# Altium PCB Switch_Matrix_32_2.PCBDOC (part 4 of 9)
Units mm, origin at the board's own origin, x right, y up, seen from the top; angles counter-clockwise.
Board outline 222.54 x 100 mm, 6 copper layers (L1, P2, L3, P4, L5, L6), stack 1.61 mm thick; 629 components, 583 nets, 2332 pads, 825 vias.
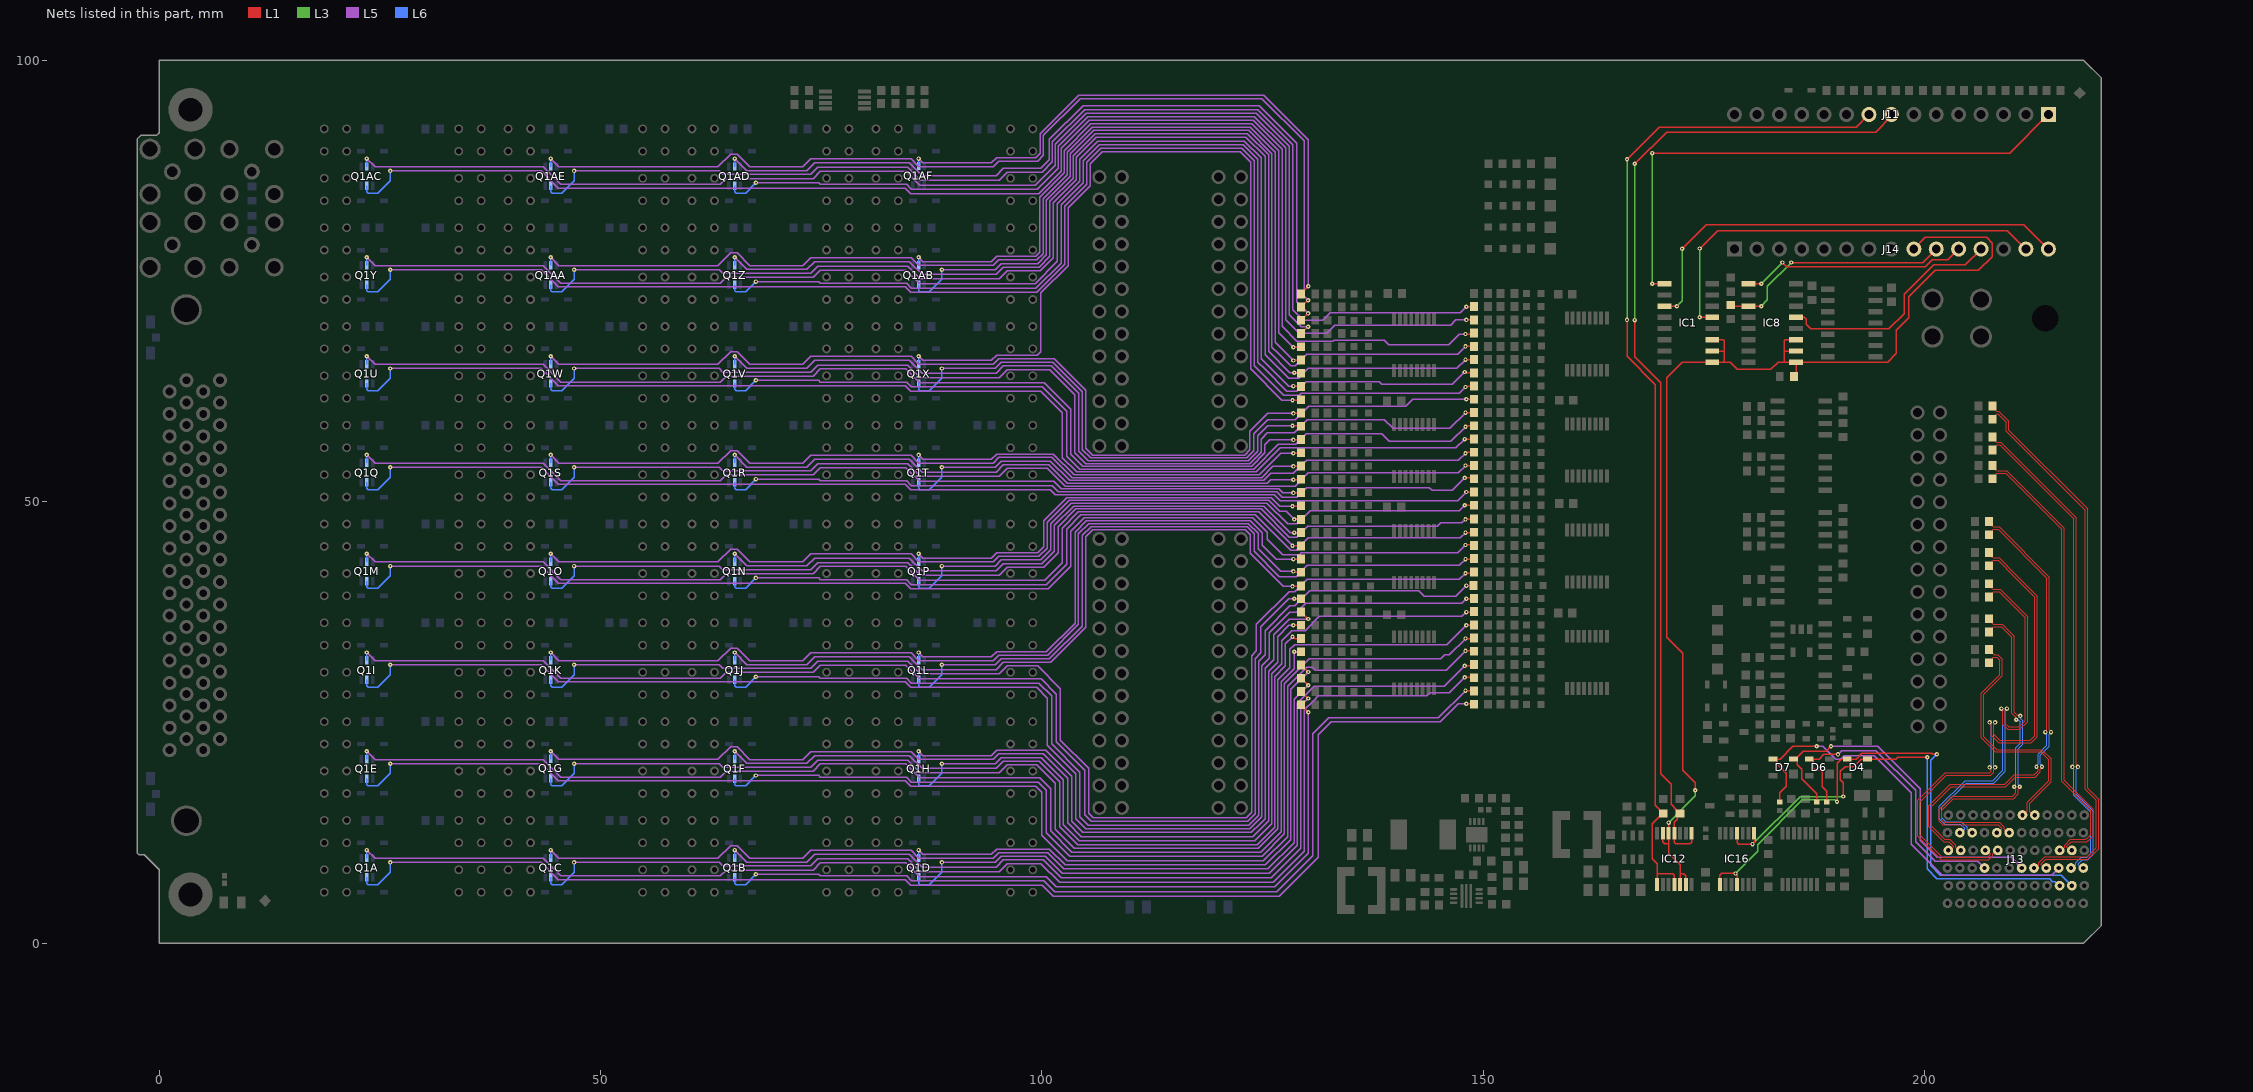
[diagram p7: the nets of this part, all layers, seen from the top]

## Part data (continued)
R23: library part R0603_62K_1%_0.1W_100PPM, "Resistor - 1%", Case=0603, Manufacturer=GENERIC, Manufacturer1 ComponentHeight=0.55mm, Manufacturer1 Example="NIC COMPONENT", Manufacturer1 Part Number=NRC06F6202TRF, Power=0.1W, Tolerance=±1%, Author="CERN DEM JLC", Component Type=Standard, CreateDate=03/12/2007, HelpURL=\\cern.ch\dfs\Applications\Altium\Datasheets\R0603_NIC_NRC.pdf, LatestRevisionDate=13/03/2008, Manufacturer Part Number=R0603_62K_1%_0.1W_100PPM, Mounted=Yes, Part Description="General Purpose Thick Film Chip Resistor", Part Number=R0603_62K_1%_0.1W_100PPM, Pin Count=2, PressFit=No, Sense=No, SMD=Yes, Socket=No, Status=Preferred, TC=±100ppm/°C
R56: library part R0603_24K_1%_0.1W_100PPM, "Resistor - 1%", Case=0603, Manufacturer=GENERIC, Manufacturer1 ComponentHeight=0.55mm, Manufacturer1 Example="NIC COMPONENT", Manufacturer1 Part Number=NRC06F2402TRF, Power=0.1W, Tolerance=±1%, Author="CERN DEM JLC", Component Type=Standard, CreateDate=03.12.2007, HelpURL=\\cern.ch\dfs\Applications\Altium\Datasheets\R0603_NIC_NRC.pdf, LatestRevisionDate=13.03.2008, Manufacturer Part Number=R0603_24K_1%_0.1W_100PPM, Mounted=Yes, Part Description="General Purpose Thick Film Chip Resistor", Part Number=R0603_24K_1%_0.1W_100PPM, Pin Count=2, PressFit=No, Sense=No, SMD=Yes, Socket=No, Status=Preferred, TC=±100ppm/°C
R85: library part R0402_220R_1%_0.0625W_100PPM, "Resistor - 1%", Case=0402, Manufacturer=GENERIC, Manufacturer1 ComponentHeight=0.4mm, Manufacturer1 Example="YAGEO PHYCOMP", Manufacturer1 Part Number=232270672201L, Power=0.0625W, Tolerance=±1%, Author="CERN DEM JLC", Component Type=Standard, CreateDate=03.12.2007, HelpURL=\\cern.ch\dfs\Applications\Altium\Datasheets\R0402_Phycomp_RC0402.pdf, LatestRevisionDate=17.10.2012, Manufacturer Part Number=R0402_220R_1%_0.0625W_100PPM, Mounted=Yes, Part Description="General Purpose Thick Film Chip Resistor", Part Number=R0402_220R_1%_0.0625W_100PPM, Pin Count=2, PressFit=No, Sense=No, SMD=Yes, Socket=No, Status="Not Recommended", TC=±100ppm/°C
R89 R90 R91 R92 R94 R97 R98A R98AA R98AB R98AC R98AD R98AE R98AF R98B R98C R98D R98E R98F R98G R98H R98I R98J R98K R98L R98M R98N R98O R98P R98Q R98R R98S R98T R98U R98V R98W R98X R98Y R98Z R99A R99AA R99AB R99AC R99AD R99AE R99AF R99B R99C R99D R99E R99F R99G R99H R99I R99J R99K R99L R99M R99N R99O R99P R99Q R99R R99S R99T R99U R99V R99W R99X R99Y R99Z R100 R112 R113 R145 R146 R147 R148 R149 R150 R152 R161 R162 R163 R164 R167 R168 R169 R170: library part R0603_0R_JUMPER, "Resistor", Case=0603, Manufacturer=GENERIC, Manufacturer1 ComponentHeight=0.55mm, Manufacturer1 Example="NIC COMPONENT", Manufacturer1 Part Number=NRC06Z0, Author="CERN DEM JLC", Component Type=Standard, CreateDate=03.12.2007, HelpURL=\\cern.ch\dfs\Applications\Altium\Datasheets\R0603_NIC_NRC.pdf, LatestRevisionDate=13.03.2008, Manufacturer Part Number=R0603_0R_JUMPER, Mounted=Yes, Part Description="1A (0.05R Max DC Resistance) Zero Ohm Jumper", Part Number=R0603_0R_JUMPER, Pin Count=2, PressFit=No, Sense=No, SMD=Yes, Socket=No, Status=Preferred
R110 R114: library part R0603_2K7_1%_0.1W_100PPM, "Resistor - 1%", Case=0603, Manufacturer=GENERIC, Manufacturer1 ComponentHeight=0.55mm, Manufacturer1 Example="YAGEO PHYCOMP", Manufacturer1 Part Number=RC0603FR-072K7L, Power=0.1W, Tolerance=±1%, Author="CERN DEM JLC", Component Type=Standard, CreateDate=02.05.2011, HelpURL=\\cern.ch\dfs\Applications\Altium\Datasheets\R0603_PHYCOMP_RC0603.pdf, LatestRevisionDate=02.05.2011, Manufacturer Part Number=R0603_2K7_1%_0.1W_100PPM, Mounted=Yes, Part Description="General Purpose Thick Film Chip Resistor", Part Number=R0603_2K7_1%_0.1W_100PPM, Pin Count=2, PressFit=No, Sense=No, SMD=Yes, Socket=No, Status=Preferred, TC=±100ppm/°C
R119 R120: library part "R0805_10M_1%_0.125W_100PPM_VISHAY_CRCW e3", "Resistor - 1%", Case=0805, Manufacturer="VISHAY DALE", Manufacturer Part Number=CRCW080510M0FKEA, Power=0.125W, Tolerance=±1%, Author="CERN DEM BC", Component Type=Standard, ComponentHeight=0.5mm, CreateDate=2019-11-12, HelpURL="\\cern.ch\dfs\Applications\Altium\Datasheets\R0805_VISHAY_CRCW e3.pdf", LatestRevisionDate=2019-11-12, Mounted=Yes, Part Description="150V, Standard Thick Film Chip Resistor", Part Number="R0805_10M_1%_0.125W_100PPM_VISHAY_CRCW e3", Pin Count=2, PressFit=No, Sense=No, SMD=Yes, Socket=No, Status=None, TC=±100ppm/°C
R126: library part R0805_1M1_1%_0.125W_100PPM, "Resistor - 1%", Case=0805, Manufacturer=GENERIC, Manufacturer1 ComponentHeight=0.6mm, Manufacturer1 Example="NIC COMPONENT", Manufacturer1 Part Number=NRC10F1104TRF, Author="CERN DEM JLC", Component Type=Standard, CreateDate=03/12/2007, HelpURL=\\cern.ch\dfs\Applications\Altium\Datasheets\R0805_NIC_NRC.pdf, LatestRevisionDate=13/03/2008, Manufacturer Part Number=R0805_1M1_1%_0.125W_100PPM, Mounted=Yes, Part Description="General Purpose Thick Film Chip Resistor", Part Number=R0805_1M1_1%_0.125W_100PPM, Pin Count=2, PressFit=No, Sense=No, SMD=Yes, Socket=No, Status=Preferred
R130 R131 R133 R136: library part R0402_22R_1%_0.0625W_100PPM, "Resistor - 1%", Case=0402, Manufacturer=GENERIC, Manufacturer1 ComponentHeight=0.4mm, Manufacturer1 Example="YAGEO PHYCOMP", Manufacturer1 Part Number=232270672209L, Power=0.0625W, Tolerance=±1%, Author="CERN DEM JLC", Component Type=Standard, CreateDate=03.12.2007, HelpURL=\\cern.ch\dfs\Applications\Altium\Datasheets\R0402_Phycomp_RC0402.pdf, LatestRevisionDate=17.10.2012, Manufacturer Part Number=R0402_22R_1%_0.0625W_100PPM, Mounted=Yes, Part Description="General Purpose Thick Film Chip Resistor", Part Number=R0402_22R_1%_0.0625W_100PPM, Pin Count=2, PressFit=No, Sense=No, SMD=Yes, Socket=No, Status="Not Recommended"
RL1A RL1AA RL1AB RL1AC RL1AD RL1AE RL1AF RL1B RL1C RL1D RL1E RL1F RL1G RL1H RL1I RL1J RL1K RL1L RL1M RL1N RL1O RL1P RL1Q RL1R RL1S RL1T RL1U RL1V RL1W RL1X RL1Y RL1Z RL2A RL2AA RL2AB RL2AC RL2AD RL2AE RL2AF RL2B RL2C RL2D RL2E RL2F RL2G RL2H RL2I RL2J RL2K RL2L RL2M RL2N RL2O RL2P RL2Q RL2R RL2S RL2T RL2U RL2V RL2W RL2X RL2Y RL2Z: library part REL_COTO_2342-05-000, "Reed Relay DPDT (2 Form C) 5VDC Coil Through Hole", Manufacturer="Coto Technology", Author=KB, Component Type=Standard, ComponentHeight=9.7mm, CreateDate=03.02.2026, HelpURL=https://cototechnology.com/library/datasheet/cotoclassic-2300-series-reed-relay-datasheet.pdf, LatestRevisionDate=03.02.2026, Manufacturer Part Number=2342-05-000, Mounted=Yes, PackageDescription="Coto Tecnology Case 2300, 8 Leads, Body Length 20.57mm, Width 5.33mm, x Height 9.7mm, 2300 Series", Part Description="Reed Relay DPDT (2 Form C) 5VDC Coil Through Hole", Part Number=2342-05-000, Pin Count=8, PressFit=No, Sense=No, SMD=No, Socket=No, Status=None
SCREW1 SCREW2: library part MECH_Tyco_SCSI_Screwlock, "SCSI Screw Lock", Manufacturer="TYCO ELECTRONICS", Manufacturer Part Number=786585-2, Part Number=TYCO_786585-2, Author=GK, ComponentHeight=9.02mm, Component Type=Mechanical, CreateDate=10.09.2013, LatestRevisionDate=10.09.2013, Mounted=Yes, PackageDescription="50SR SCREWLOCK KIT, FEMALE", Part Description="50SR SCREWLOCK KIT, FEMALE", Pin Count=0, PressFit=No, Sense=No, SMD=No, Socket=No, Status=None
T1 T2 T3 T4: "N-CHANNEL MOSFET WITH DIODE", Case=SOT23-3, Manufacturer="ON SEMICONDUCTOR", Manufacturer Part Number=BSS138L, Author="CERN DEM JLC", Bonding=No, Component Type=Standard, ComponentHeight=1.11mm, CreateDate=23.03.2009, Device=BSS138LT1G, HelpURL=\\cern.ch\dfs\Applications\Altium\Datasheets\BSS138LT1G.pdf, LatestRevisionDate=25.05.2022, Mounted=Yes, PackageDescription="SOT23, 0.95mm Pitch; 3 Pin, 1.40mm W X 3.00mm L X 1.10mm H body, IPC Medium Density", Part Description="50V, 200mA N-Channel Enhancement Mode Field-Effect Transistor", Part Number=BSS138LT1G, Pin Count=3, PressFit=No, Sense=No, SMD=Yes, Socket=No
TP1 TP2 TP3 TP4 TP5 TP7 TP11 TP16 TP17: library part SMD_PAD_1.27X1.27MM, Author="CERN DEM JLC", ComponentHeight=0mm, Component Type="Standard (No BOM)", CreateDate=12.01.2008, Family="Test Point", HelpURL=Undefined, LatestRevisionDate=12.01.2008, Mounted=No, PackageDescription="1.27mm x 1.27mm PCB Copper Area (SMD Test Point)", Part Description="1.27mm x 1.27mm PCB Copper Area (SMD Test Point)", Part Number=SMD_PAD_1.27X1.27MM, Pin Count=1, Sense=No, SMD=Yes, Socket=No, Status=None

## Via types
v1: diameter 0.5, hole 0.2, L1 to L6, tented both sides, 775 vias
v2: diameter 0.7, hole 0.4, L1 to L6, tented both sides, 41 vias
v3: diameter 0.5, hole 0.2, L1 to L6, 5 vias
v4: diameter 0.6, hole 0.3, L1 to L6, tented both sides, 4 vias

## Nets (pads, with @x,y where several pads share a name; then routed paths per layer and width w, separated by ;. In a path a pad name is that pad's centre, name@x,y a point inside that pad or via, vN(x,y) a via of type N, cw(c..) or ccw(c..) an arc to the next point about the centre after c; other vN are vias at no path point)
ARDU_CSnA: IC8.13 J14.12 | length 26.8
  L1 w0.152: IC8.13@185.45,70.885 186.384,70.885 186.6,70.669 186.6,70.089 186.689,70 186.7,70 187.1,69.6 195.973,69.6 197.684,71.311 197.684,73.484 201.024,76.824 204.604,76.824 J14.12@206.41,78.63
ARDU_CSnB: IC8.1 J14.11 | length 25.9
  L1 w0.152: IC8.1@180.05,74.695 IC8.1@180.057,74.688 ; IC8.1@180.057,74.695 v1(181.493,74.695) ; v1(183.899,77.101) 184.396,76.604 200.104,76.604 200.9,77.4 202.64,77.4 J14.11@203.87,78.63
  L3 w0.152: v1(181.493,74.695) v1(183.899,77.101)
ARDU_MISO: IC1.3 J14.15 | length 52
  L1 w0.152: IC1.3@170.595,72.2 IC1.3@170.55,72.155 v1(171.945,72.155) ; v1(172.535,78.648) 175.287,81.4 211.26,81.4 J14.15@214.03,78.63
  L3 w0.152: v1(171.945,72.155) 172.535,72.745 v1(172.535,78.648)
ARDU_MOSI: IC1.13 J14.14 | length 47.9
  L1 w0.152: v1(174.518,78.685) 176.556,80.723 209.397,80.723 J14.14@211.49,78.63 ; v1@174.54,70.892 IC1.13@175.942,70.892 ; IC1.13@175.935,70.9 IC1.13@175.942,70.892 ; IC1.13@175.95,70.885 IC1.13@175.942,70.892
  L3 w0.152: v1(174.518,70.892) v1(174.518,78.685)
ARDU_MUX: IC1.9 IC1.10 IC1.11 IC8.9 IC8.10 IC8.11 IC12.5 IC12.6 IC12.12 IC12.13 J14.9 R96.2 | length 133.6
  L1 w0.152: IC12.6@170.36,12.465 IC12.6@170.36,12.448 170.36,11.465 170.585,11.24 171.01,11.24 ; IC12.5@171.01,12.448 171.01,11.24 ; IC12.5@171.009,12.448 v1(171.009,13.648) ; IC12.12@172.31,6.648 172.31,7.873 ; IC12.13@172.96,6.648 172.96,7.648 172.735,7.873 172.31,7.873 ; v1(174.038,17.3) 174.038,18.162 172.6,19.6 172.6,32.828 170.773,34.655 170.773,64.023 172.55,65.8 175.95,65.8 177.201,65.8 ; IC1.10@175.95,67.075 177.29,67.075 ; IC1.11@175.95,68.345 177.201,68.345 177.29,68.256 177.29,67.075 ; R96.2@185.2,64.2 185.45,64.45 IC8.9@185.45,65.805 ; IC8.10@185.45,67.075 184.11,67.075 ; IC8.11@185.45,68.345 184.199,68.345 184.11,68.256 184.11,67.075 ; J14.9@198.79,78.63 200.104,79.944 207.056,79.944 207.692,79.308 207.692,77.776 206.117,76.2 201.2,76.2 198.233,73.233 198.233,70.833 196.8,69.4 196.8,66.793 195.812,65.805 IC8.9@185.45,65.805 ; 171.01,11.24 171.01,10.19 172.31,8.89 172.31,7.873 ; 177.201,65.8 178,65.8 178.8,65 182.6,65 183.405,65.805 184.194,65.805 ; 177.201,65.8 177.29,65.889 177.29,67.075 ; 184.11,67.075 184.11,65.889 184.194,65.805 ; 184.194,65.805 IC8.9@185.45,65.805
  L3 w0.152: v1(171.009,13.648) 174.038,16.677 v1(174.038,17.3)
ARDU_OE: IC8.3 J14.10 R95.2 | length 26.8
  L1 w0.152: R95.2@178.25,72.3 178.395,72.155 IC8.3@180.05,72.155 IC8.3@180.105,72.1 ; IC8.3@180.069,72.155 v1@181.471,72.155 ; v1(184.9,77.101) 199.801,77.101 J14.10@201.33,78.63
  L3 w0.152: v1(181.493,72.155) 182.2,72.862 182.2,74.4 v1@184.9,77.1 ; J14.10@201.315,78.615 J14.10@201.33,78.63
ARDU_SCK: IC1.1 J11.1 | length 62.6
  L1 w0.152: v1(169.15,74.695) IC1.1@170.545,74.695 ; 169.4,89.5 209.66,89.5 J11.1@214.03,93.87
  L1 w0.254: IC1.1@170.547,74.697 IC1.1@170.55,74.695
  L3 w0.152: v1(169.15,74.695) v1(169.15,89.5)
ARDU_SCL: IC12.8 IC12.11 J11.9 R102.2 | length 117.1
  L1 w0.152: v1(166.297,70.602) 166.297,66.455 169.507,63.244 169.507,18.107 169.5,18.1 169.5,15.6 169.976,15.124 169.976,15.074 R102.2@170.35,14.7 ; v1(166.297,88.8) 169.949,92.453 192.293,92.453 J11.9@193.71,93.87 ; IC12.8@169.71,6.665 169.71,7.858 ; R102.2@170.4,14.7 R102.2@170.35,14.7 ; IC12.11@171.66,6.665 171.66,7.664 171.465,7.858 169.71,7.858 ; 169.71,7.858 169.71,8.99 169.147,9.553 169.147,13.497 R102.2@170.35,14.7
  L3 w0.152: v1(166.297,70.602) v1(166.297,88.8)
ARDU_SDA: IC12.1 IC12.4 J11.8 R101.2 | length 114
  L1 w0.152: v1(167.179,70.575) 167.179,66.421 170.107,63.493 170.107,19.193 171.3,18 171.3,15.7 171.876,15.124 171.876,15.074 R101.2@172.157,14.793 ; v1(167.179,88.279) 170.773,91.873 194.473,91.873 196.25,93.65 J11.8@196.25,93.87 ; R101.2@172.3,14.7 172.25,14.7 R101.2@172.157,14.793 ; IC12.1@173.61,12.465 IC12.1@173.61,12.448 173.61,11.429 173.412,11.231 171.831,11.231 171.66,11.403 IC12.4@171.66,12.448 171.66,13.665 171.999,14.004 171.999,14.635 R101.2@172.157,14.793
  L3 w0.152: v1(167.179,70.575) v1(167.179,88.279)
BGA0: D7.3 J13.C3 R130.2 | length 48.7
  L1 w0.152: D7.3@182.85,20.85 D7.3@183.05,20.85 ; R130.2@183.6,15.97 183.6,17 184.349,17.749 184.349,19.247 183.274,20.321 183.274,20.626 D7.3@183.05,20.85 ; v1(187.802,22.294) 185.094,22.294 183.65,20.85 D7.3@183.05,20.85
  L5 w0.152: v1(187.802,22.294) 188.49,22.294 189.946,20.839 190.539,20.839 190.9,21.2 194.3,21.2 198.5,17 198.5,11.2 202,7.7 214.4,7.7 J13.C3@215.2,8.5
BGA1: D7.2 J13.F3 R131.2 | length 41.5
  L1 w0.152: D7.2@185.15,20.85 D7.2@185.35,20.85 ; R131.2@187.8,15.97 187.8,16.9 186.1,18.6 186.1,19.7 185.574,20.226 185.574,20.626 D7.2@185.35,20.85 ; v1(189.401,22.294) 188.846,21.739 186.239,21.739 D7.2@185.35,20.85
  L5 w0.152: v1(189.401,22.294) 194.706,22.294 199.5,17.5 199.5,11.65 201.45,9.701 209.799,9.701 J13.F3@211,8.5
BGA2: D6.3 J13.I3 R136.2 | length 35.3
  L1 w0.152: R136.2@188.9,15.97 188.9,17.2 188.4,17.7 188.4,19.4 188.2,19.6 187.6,19.6 187.374,19.826 187.374,20.626 187.174,20.626 D6.3@186.95,20.85 188.05,20.85 188.569,21.369 v1(190.2,21.369)
  L5 w0.152: v1(190.2,21.369) 190.631,21.8 194.5,21.8 199,17.3 199,11.458 201.205,9.253 206.047,9.253 J13.I3@206.8,8.5
BP_I2C.SCL: D4.3 IC16.8 IC16.11 J13.B2 | length 65.9
  L1 w0.152: IC16.8@176.832,6.625 IC16.8@176.809,6.648 ; IC16.8@176.909,6.748 IC16.8@176.809,6.648 ; IC16.11@178.759,6.665 178.759,7.709 v1(178.587,7.881) 177.007,7.881 176.809,7.683 IC16.8@176.809,6.648 ; v1(190.088,16) 190.088,20.388 190.55,20.85 D4.3@191.25,20.85 192.25,20.85 192.9,21.5 200.812,21.5 200.922,21.39 v1(201.402,21.39)
  L3 w0.152: v1(178.587,7.881) 181.085,10.379 181.085,11.161 186.132,16.208 189.825,16.208 190.033,16 v1(190.088,16)
  L6 w0.152: v1(201.402,21.39) 200.7,20.687 200.7,8.8 201.804,7.696 215.504,7.696 J13.B2@216.7,6.5
BP_I2C.SDA: D4.2 IC16.1 IC16.4 J13.C2 | length 58.6
  L1 w0.152: IC16.4@178.759,12.431 178.759,11.386 178.93,11.215 v1(180.511,11.215) 180.709,11.413 IC16.1@180.709,12.448 ; v1(190.8,16.6) 190.8,18.174 190.467,18.507 190.467,19.467 191,20 192,20 192.85,20.85 D4.2@193.55,20.85 196.75,20.85 196.943,21.043 v1(200.317,21.043)
  L3 w0.152: v1(180.511,11.215) 185.896,16.6 v1(190.8,16.6)
  L6 w0.152: v1(200.317,21.043) 200.3,21.026 200.3,8.4 201.396,7.304 214.161,7.304 214.493,6.973 214.827,6.973 J13.C2@215.3,6.5
BP_IO.LVDS_N0: J13.E3 R161.1 | length 62.9
  L1 w0.127: R161.1@207.7,59.35 208.087,59.736 208.087,59.886 208.161,59.96 208.309,59.96 209.263,59.007 209.263,58.007 218.236,49.034 218.236,17.405 219.467,16.174 219.467,10.784 218.443,9.76 213.617,9.76 212.96,9.103 212.96,8.882 212.579,8.5 J13.E3@212.4,8.5
BP_IO.LVDS_N1: J13.B3 R162.1 | length 54.9
  L1 w0.127: R162.1@207.7,55.85 208.087,56.237 208.087,56.386 208.161,56.46 208.54,56.46 216.928,48.072 216.928,20.217 216.755,20.043 v1(216.755,19.956)
  L6 w0.127: J13.B3@216.6,8.5 216.779,8.5 217.16,8.882 217.16,9.103 217.77,9.713 218.36,9.713 218.841,10.193 218.841,14.807 216.928,16.719 216.928,19.695 216.755,19.869 v1(216.755,19.956)
BP_IO.LVDS_N2: J13.C4 R163.1 | length 51.1
  L1 w0.127: R163.1@207.7,52.6 208.087,52.987 208.087,53.136 208.161,53.21 209.184,53.21 212.982,49.413 215.535,46.859 215.535,18.343 218.84,15.037 218.841,12.293 218.427,11.88 218.404,11.88 218.248,11.759 216.517,11.759 215.86,11.103 215.86,10.882 215.479,10.5 J13.C4@215.3,10.5
BP_IO.LVDS_N3: J13.L4 R164.1 | length 52.6
  L1 w0.127: J13.L4@202.7,10.5 202.879,10.5 203.26,10.882 203.26,10.987 202.767,11.48 202.178,11.48 200.5,13.158 200.5,15.575 200.664,15.739 202.74,17.816 202.904,17.979 209.079,17.979 210.179,19.079 212.409,19.079 212.859,19.53 212.859,19.718 212.685,19.892 v1(212.685,19.979) ; R164.1@207.3,46.25 207.687,46.637 207.687,46.786 207.761,46.86 208.341,46.86 213.875,41.326 213.875,24.158 213.701,23.984 v1(213.701,23.897)
  L6 w0.127: v1(212.685,19.979) 212.685,20.066 212.859,20.24 212.859,21.406 213.875,22.422 213.875,23.636 213.701,23.81 v1(213.701,23.897)
BP_IO.LVDS_N4: J13.I4 R167.1 | length 58.9
  L1 w0.127: J13.I4@206.9,10.5 207.079,10.5 207.46,10.118 207.46,10.013 207.147,9.7 202,9.7 199.5,12.2 199.5,16.035 202.465,19 207.482,19 207.826,19.344 207.826,19.639 208,19.813 v1(208,19.9) ; R167.1@207.3,42.75 207.687,43.137 207.687,43.289 207.761,43.363 208.337,43.363 210.178,41.523 212.5,39.201 212.5,23.5 212,23 208.5,23 208.277,23.223 207.826,23.674 207.826,24.739 208,24.913 v1(208,25)
  L6 w0.127: v1(208,19.9) 208,19.987 207.826,20.161 207.826,24.725 208,24.899 v1(208,25)
BP_IO.LVDS_N5: J13.K5 R168.1 | length 44.7
  L1 w0.127: R168.1@207.3,40.7 207.687,40.313 207.687,40.164 207.761,40.09 208.573,40.09 208.737,39.926 211.364,37.299 211.608,37.055 211.69,36.973 211.69,25.089 210.803,24.202 209.403,24.202 208.882,24.723 208.882,26.303 208.708,26.476 v1(208.708,26.564)
  L6 w0.127: J13.K5@204,12.5 204.179,12.5 204.56,12.882 204.56,12.987 204.067,13.48 202.278,13.48 201.68,14.078 201.68,15.491 204.589,18.4 207.705,18.4 208.882,19.577 208.882,26.303 208.708,26.476 v1(208.708,26.564)
BP_IO.LVDS_N6: J13.H5 R169.1 | length 41
  L1 w0.127: R169.1@207.3,35.25 207.687,35.637 207.687,35.786 207.761,35.86 208.687,35.86 209.877,34.671 209.877,26.057 210.336,25.597 210.336,25.351 v1(210.398,25.29) ; J13.H5@208.2,12.5 208.379,12.5 208.76,12.882 208.76,12.987 208.347,13.4 202.084,13.4 201.68,13.804 201.68,15.175 201.844,15.339 202.988,16.483 203.151,16.646 209.984,16.646 210.347,17.009 210.347,17.439 210.173,17.613 v1(210.173,17.7)
  L6 w0.127: v1(210.173,17.7) 210.173,17.787 210.347,17.961 210.347,22.132 210.838,22.623 210.838,25.095 210.705,25.228 210.459,25.228 v1(210.398,25.29)
BP_IO.LVDS_N7: J13.F6 R170.1 | length 27.6
  L1 w0.127: R170.1@207.3,31.75 207.687,32.137 207.687,32.286 207.761,32.36 208.195,32.36 208.508,32.048 208.508,30.403 206.42,28.315 206.42,23.271 206.583,23.107 207.327,22.364 207.96,21.73 208.042,21.648 213.193,21.648 214.1,20.741 214.1,18.379 211.66,15.94 211.66,15.103 211.66,14.882 211.279,14.5 J13.F6@211.1,14.5
BP_IO.LVDS_P0: J13.D3 R145.1 | length 63.3
  L1 w0.127: R145.1@207.7,60.85 208.087,60.463 208.087,60.314 208.161,60.24 208.425,60.24 209.542,59.122 209.542,58.122 218.421,49.244 218.421,49.208 218.49,49.139 218.49,17.51 219.721,16.279 219.721,10.679 218.522,9.48 213.733,9.48 213.24,8.987 213.24,8.882 213.621,8.5 J13.D3@213.8,8.5
BP_IO.LVDS_P1: J13.A3 R146.1 | length 55.4
  L1 w0.127: R146.1@207.7,57.35 208.087,56.963 208.087,56.814 208.161,56.74 208.655,56.74 217.208,48.187 217.208,20.217 217.382,20.043 v1(217.382,19.956)
  L6 w0.127: v1(217.382,19.956) 217.382,19.869 217.208,19.695 217.208,16.835 219.12,14.922 219.12,10.078 218.476,9.433 217.886,9.433 217.44,8.987 217.44,8.882 217.821,8.5 J13.A3@218,8.5
BP_IO.LVDS_P2: J13.B4 R147.1 | length 51.6
  L1 w0.127: R147.1@207.7,54.1 208.087,53.713 208.087,53.564 208.161,53.49 209.3,53.49 213.098,49.692 215.814,46.975 215.814,18.458 218.956,15.317 219.12,15.153 219.12,12.178 218.543,11.6 218.52,11.6 218.4,11.48 216.633,11.48 216.14,10.987 216.14,10.882 216.521,10.5 J13.B4@216.7,10.5
BP_IO.LVDS_P3: J13.K4 R148.1 | length 53.1
  L1 w0.127: J13.K4@204.1,10.5 203.921,10.5 203.54,10.882 203.54,11.103 202.883,11.759 202.293,11.759 200.779,13.273 200.779,15.46 203.02,17.7 209.195,17.7 210.295,18.8 212.524,18.8 213.138,19.414 213.138,19.718 213.312,19.892 v1(213.312,19.979) ; R148.1@207.3,47.75 207.687,47.363 207.687,47.214 207.761,47.14 208.456,47.14 214.154,41.442 214.154,24.158 214.328,23.984 v1(214.328,23.897)
  L6 w0.127: v1(213.312,19.979) 213.312,20.066 213.138,20.24 213.138,21.29 214.154,22.306 214.154,23.636 214.328,23.81 v1(214.328,23.897)
BP_IO.LVDS_P4: J13.H4 R149.1 | length 61.2
  L1 w0.127: R149.1@207.3,44.25 207.687,43.863 207.687,43.717 207.761,43.643 208.453,43.643 210.294,41.802 212.779,39.316 212.779,23.384 212.116,22.721 208.384,22.721 207.547,23.558 207.547,24.739 207.373,24.913 v1(207.373,25) ; v1(207.373,19.9) 207.373,19.813 207.547,19.639 207.547,19.46 207.367,19.279 202.349,19.279 199.221,16.151 199.221,12.084 201.884,9.421 207.263,9.421 207.74,9.897 207.74,10.118 208.121,10.5 J13.H4@208.3,10.5
  L6 w0.127: v1(207.373,19.9) 207.373,19.987 207.547,20.161 207.547,24.725 207.373,24.899 v1(207.373,25)
BP_IO.LVDS_P5: J13.J5 R150.1 | length 43.3
  L1 w0.127: R150.1@207.3,39.2 207.687,39.587 207.687,39.736 207.761,39.81 208.457,39.81 211.411,36.857 211.411,25.205 210.687,24.481 209.519,24.481 209.161,24.839 209.161,26.303 209.335,26.476 v1(209.335,26.564)
  L6 w0.127: J13.J5@205.4,12.5 205.221,12.5 204.84,12.882 204.84,13.103 204.183,13.76 202.393,13.76 201.959,14.193 201.959,15.376 204.705,18.121 207.821,18.121 209.161,19.461 209.161,26.303 209.335,26.476 v1(209.335,26.564)
BP_IO.LVDS_P6: J13.G5 R97.1 | length 41.5
  L1 w0.127: R97.1@207.3,36.75 207.687,36.363 207.687,36.214 207.761,36.14 208.803,36.14 210.156,34.787 210.156,26.173 210.534,25.795 210.78,25.795 v1(210.841,25.733) ; J13.G5@209.6,12.5 209.421,12.5 209.04,12.882 209.04,13.103 208.463,13.679 202.2,13.679 201.959,13.92 201.959,15.059 203.267,16.367 210.1,16.367 210.626,16.893 210.626,17.439 210.8,17.613 v1(210.8,17.7)
  L6 w0.127: v1(210.8,17.7) 210.8,17.787 210.626,17.961 210.626,22.016 211.118,22.507 211.118,25.211 210.903,25.426 210.903,25.672 v1(210.841,25.733)
BP_IO.LVDS_P7: J13.E6 R152.1 | length 28
  L1 w0.127: R152.1@207.3,33.25 207.91,32.64 208.311,32.64 208.787,32.163 208.787,30.287 206.699,28.199 206.699,23.387 208.158,21.928 213.308,21.928 214.379,20.857 214.379,18.264 211.94,15.824 211.94,14.987 211.94,14.882 212.321,14.5 J13.E6@212.5,14.5
CTRL1A: Q1A.5 R2A.2 | length 129.3
  L1 w0.152: R2A.2@129.375,27 129.375,26.95 130.18,26.145 v1(130.2,26.145)
  L5 w0.152: v1(23.527,10.534) 24.461,9.6 43.5,9.6 45.503,7.597 63.559,7.597 64.237,8.275 74.075,8.275 74.9,9.1 84.605,9.1 86.171,7.534 100.483,7.534 101.653,6.363 126.389,6.363 130.2,10.174 v1(130.2,26.145)
  L6 w0.152: Q1A.5@23.527,9.634 v1(23.527,10.534)
CTRL1B: Q1A.2 R2B.2 | length 146.6
  L1 w0.152: v1(148.1,27.1) 148.9,27.1 R2B.2@148.95,27.05
  L5 w0.152: v1(26.174,9.134) 43.266,9.134 45.202,7.198 84.502,7.198 85.127,6.573 100.027,6.573 101.3,5.3 106,5.3 126.419,5.3 126.9,5.3 131.3,9.7 131.3,23.6 132.764,25.064 145.164,25.064 147.2,27.1 v1(148.1,27.1)
  L6 w0.152: Q1A.2@23.527,7.434 23.527,6.768 23.684,6.611 24.756,6.611 26.174,8.029 v1(26.174,9.134)
CTRL2A: Q1B.5 R4A.2 | length 87.6
  L1 w0.152: R4A.2@129.375,28.5 129.375,28.45 129.749,28.076 129.804,28.076 v1(130.171,27.709)
  L5 w0.152: v1(65.199,10.534) 66.573,9.16 73.373,9.16 74.254,10.041 84.995,10.041 86.438,8.597 94.827,8.597 95.652,9.423 100.177,9.423 102.2,7.4 126,7.4 129.339,10.739 129.339,26.877 v1(130.171,27.709)
  L6 w0.152: Q1B.5@65.199,9.634 v1(65.199,10.534)
CTRL2B: Q1B.2 R4B.2 | length 103.3
  L1 w0.152: v1(148,28.6) 148.9,28.6 R4B.2@148.95,28.55
  L5 w0.152: v1(67.608,7.792) 74.7,7.792 74.894,7.597 84.667,7.597 85.223,7.041 99.785,7.041 100.223,7.041 101.452,5.812 126.61,5.812 130.7,9.901 130.7,23.7 132.5,25.5 144.9,25.5 v1(148,28.6)
  L6 w0.152: Q1B.2@65.199,7.434 65.199,6.768 65.356,6.611 66.428,6.611 v1(67.608,7.792)
CTRL3A: Q1C.5 R6A.2 | length 109.3
  L1 w0.152: R6A.2@129.375,29.95 129.749,29.576 129.804,29.576 v1(130.171,29.209)
  L5 w0.152: v1(44.363,10.534) 45.291,9.606 63.306,9.606 64.732,11.032 65.493,11.032 66.925,9.6 72.924,9.6 73.831,10.507 85.188,10.507 86.08,9.615 94.515,9.615 95.145,10.245 100.655,10.245 102.5,8.4 125.6,8.4 128.58,11.38 128.58,27.618 v1(130.171,29.209)
  L6 w0.152: Q1C.5@44.363,9.634 v1(44.363,10.534)
CTRL3B: Q1C.2 R6B.2 | length 128.3
  L1 w0.152: v1(147.9,30.1) 148.9,30.1 R6B.2@148.95,30.05
  L5 w0.152: v1(47.01,9.134) 63.466,9.134 63.864,8.736 73.809,8.736 74.597,9.524 84.781,9.524 86.207,8.098 95.148,8.098 96.056,9.007 99.893,9.007 102,6.9 126.226,6.9 129.747,10.421 129.747,26.406 130.744,27.403 131.341,28 143.6,28 143.962,28.362 146.162,28.362 v1(147.9,30.1)
  L6 w0.152: Q1C.2@44.363,7.434 44.363,6.768 44.52,6.611 45.592,6.611 47.01,8.029 v1(47.01,9.134)
CTRL4A: Q1D.5 R74A.2 | length 66.3
  L1 w0.152: R74A.2@129.375,31.45 129.749,31.076 129.804,31.076 v1(130.171,30.709)
  L5 w0.152: v1(86.035,10.534) 86.524,10.045 94.295,10.045 94.887,10.637 100.152,10.637 100.863,10.637 102.64,8.86 125.333,8.86 128.202,11.729 128.202,28.731 v1@130.171,30.7
  L6 w0.152: Q1D.5@86.035,9.634 v1(86.035,10.534)
CTRL4B: Q1D.2 R74B.2 | length 85.6
  L1 w0.152: v1(147.9,31.4) 148.8,31.4 R74B.2@148.95,31.55
  L5 w0.152: v1(88.682,9.134) 94.704,9.134 95.397,9.827 100.373,9.827 102.3,7.9 125.745,7.9 128.939,11.094 128.939,27.192 130.847,29.1 145.6,29.1 v1(147.9,31.4)
  L6 w0.152: Q1D.2@86.035,7.434 86.035,6.768 86.192,6.611 87.264,6.611 88.682,8.029 v1(88.682,9.134)
CTRL5A: Q1E.5 R76A.2 | length 136
  L1 w0.152: v1(128.6,33) R76A.2@129.375,33
  L5 w0.152: v1(23.527,21.726) 24.461,20.792 43.5,20.792 45.503,18.789 63.559,18.789 64.237,19.467 74.075,19.467 74.9,20.292 84.605,20.292 86.171,18.726 99.761,18.726 101,17.487 101,12.7 103.4,10.3 124.8,10.3 127.1,12.6 127.1,29.6 128.6,31.1 v1(128.6,33)
  L6 w0.152: Q1E.5@23.527,20.826 v1(23.527,21.726)
CTRL5B: Q1E.2 R76B.2 | length 155.4
  L1 w0.152: v1(148,33.1) 148.9,33.1 R76B.2@148.95,33.05
  L5 w0.152: v1(26.174,20.326) 43.266,20.326 45.202,18.39 84.502,18.39 85.127,17.765 99.335,17.765 100,17.1 100,12.2 102.9,9.3 125.1,9.3 127.833,12.033 127.833,29.071 129.987,31.225 130.675,31.225 131,30.9 145.8,30.9 v1(148,33.1)
  L6 w0.152: Q1E.2@23.527,18.626 23.527,17.96 23.684,17.803 24.756,17.803 26.174,19.221 v1(26.174,20.326)
CTRL6A: Q1F.5 R78A.2 | length 95.2
  L1 w0.152: v1(128.4,34.7) 128.467,34.7 128.667,34.5 R78A.2@129.375,34.5
  L5 w0.152: v1(65.199,21.726) 66.573,20.352 73.373,20.352 74.254,21.233 84.995,21.233 86.438,19.789 94.827,19.789 95.652,20.615 99.685,20.615 102,18.3 102,13.2 104.066,11.134 124.389,11.134 126.38,13.126 126.38,30.18 127.6,31.4 127.6,33.9 v1(128.4,34.7)
  L6 w0.152: Q1F.5@65.199,20.826 v1(65.199,21.726)
CTRL6B: Q1F.2 R78B.2 | length 111.8
  L1 w0.152: v1(148,34.5) 148.9,34.5 R78B.2@148.95,34.55
  L5 w0.152: v1(67.608,18.984) 74.7,18.984 74.894,18.789 84.667,18.789 85.223,18.233 99.567,18.233 100.5,17.3 100.5,12.5 103.153,9.847 124.947,9.847 127.458,12.358 127.458,29.358 130.3,32.2 130.988,32.2 145.181,32.2 145.62,32.639 146.139,32.639 v1(148,34.5)
  L6 w0.152: Q1F.2@65.199,18.626 65.199,17.96 65.356,17.803 66.428,17.803 v1(67.608,18.984)
CTRL7A: Q1G.5 R80A.2 | length 116.9
  L1 w0.152: v1(128.5,36) R80A.2@129.375,36
  L5 w0.152: v1(44.363,21.726) 45.291,20.798 63.306,20.798 64.732,22.224 65.493,22.224 66.925,20.792 72.924,20.792 73.831,21.699 85.188,21.699 86.08,20.807 94.515,20.807 95.145,21.437 100.162,21.437 102.908,18.691 102.908,13.612 104.455,12.065 123.919,12.065 125.685,13.831 125.685,30.785 126.7,31.8 126.7,34.7 128,36 v1(128.5,36)
  L6 w0.152: Q1G.5@44.363,20.826 Q1G.5@44.363,20.887 v1(44.363,21.726)
CTRL7B: Q1G.2 R80B.2 | length 137
  L1 w0.152: v1(148.1,36) 148.9,36 R80B.2@148.95,36.05
  L5 w0.152: v1(47.01,20.326) 63.466,20.326 63.864,19.928 73.809,19.928 74.597,20.716 84.781,20.716 86.207,19.29 95.148,19.29 96.056,20.199 99.401,20.199 101.5,18.1 101.5,12.9 103.658,10.742 124.542,10.742 126.725,12.925 126.725,29.825 128.1,31.2 128.1,33.273 128.627,33.8 145.9,33.8 v1(148.1,36)
  L6 w0.152: Q1G.2@44.363,18.626 44.363,17.96 44.52,17.803 45.592,17.803 47.01,19.221 v1(47.01,20.326)
CTRL8A: Q1H.5 R82A.2 | length 75.1
  L1 w0.152: R82A.2@129.375,37.45 129.749,37.076 129.804,37.076 v1(130.171,36.709)
  L5 w0.152: v1(86.035,21.726) 86.524,21.237 94.295,21.237 94.887,21.829 100.423,21.829 103.37,18.882 103.37,13.804 104.647,12.528 123.728,12.528 124.72,13.52 125.305,14.105 125.305,31.141 126.254,32.09 126.254,34.927 128.035,36.709 v1(130.171,36.709)
  L6 w0.152: Q1H.5@86.035,20.826 v1(86.035,21.726)
CTRL8B: Q1H.2 R82B.2 | length 94.7
  L1 w0.152: v1(148.1,37.5) 148.9,37.5 R82B.2@148.95,37.55
  L5 w0.152: v1(88.682,20.326) 94.704,20.326 95.397,21.019 99.917,21.019 102.439,18.497 102.439,13.418 104.261,11.597 124.113,11.597 125.622,13.105 126.03,13.513 126.03,30.53 127.16,31.66 127.16,34.26 128.3,35.4 129.855,35.4 131.455,37 147.6,37 v1(148.1,37.5)
  L6 w0.152: Q1H.2@86.035,18.626 86.035,17.96 86.192,17.803 87.264,17.803 88.682,19.221 v1(88.682,20.326)
CTRL9A: Q1I.5 R84A.2 | length 144.5
  L1 w0.152: v1(128.6,39) R84A.2@129.375,39
  L5 w0.152: v1(23.527,32.918) 24.461,31.984 43.5,31.984 45.503,29.981 63.559,29.981 64.237,30.659 74.075,30.659 74.9,31.484 84.605,31.484 86.171,29.918 99.906,29.918 101.614,28.21 101.614,22.796 104.835,19.575 104.835,14.517 105.569,13.783 123.31,13.783 124.166,14.639 124.166,32.235 124.809,32.878 124.809,35.816 127.992,39 v1(128.6,39)
  L6 w0.152: Q1I.5@23.527,32.018 v1(23.527,32.918)
CTRL9B: Q1I.2 R84B.2 | length 164.2
  L1 w0.152: v1(148.1,39) 148.9,39 R84B.2@148.95,39.05
  L5 w0.152: v1(26.174,31.518) 43.266,31.518 45.202,29.582 84.502,29.582 85.127,28.957 99.409,28.957 100.63,27.735 100.63,22.388 103.851,19.167 103.851,14.086 104.998,12.939 123.555,12.939 124.936,14.32 124.936,31.44 125.781,32.286 125.781,35.167 128.114,37.5 128.9,37.5 129.9,38.5 147.6,38.5 v1(148.1,39)
  L6 w0.152: Q1I.2@23.527,29.818 23.527,29.152 23.684,28.995 24.756,28.995 26.174,30.413 v1(26.174,31.518)
CTRL10A: Q1J.5 R22A.2 | length 83.1
  L1 w0.152: v1(128.4,40.4) 129.3,40.4 R22A.2@129.35,40.45
  L5 w0.152: v1(65.199,32.918) 66.573,31.544 73.373,31.544 74.254,32.425 84.995,32.425 86.438,30.981 94.827,30.981 95.652,31.807 101.024,31.807 104.97,35.753 104.97,46.05 105.759,46.838 123.029,46.838 123.637,46.231 123.637,44.137 127.374,40.4 v1(128.4,40.4)
  L6 w0.152: Q1J.5@65.199,32.018 v1(65.199,32.918)
CTRL10B: Q1J.2 R22B.2 | length 121.6
  L1 w0.152: v1(148.1,40.5) R22B.2@148.925,40.5
  L5 w0.152: v1(67.608,30.176) 74.7,30.176 74.894,29.981 84.667,29.981 85.223,29.425 99.093,29.425 99.675,29.425 101.1,28 101.1,22.583 104.321,19.362 104.321,14.308 105.268,13.361 123.428,13.361 124.548,14.481 124.548,31.948 125.282,32.682 125.282,35.382 128.1,38.2 128.673,38.2 130.373,39.9 142.7,39.9 143.3,39.3 146.9,39.3 v1(148.1,40.5)
  L6 w0.152: Q1J.2@65.199,29.818 65.199,29.152 65.356,28.995 66.428,28.995 v1(67.608,30.176)
CTRL11A: Q1K.5 R25A.2 | length 104
  L1 w0.152: v1(128.5,42.1) 128.567,42.1 128.667,42 R25A.2@129.375,42
  L5 w0.152: v1(44.363,32.918) 45.291,31.99 63.306,31.99 64.732,33.416 65.493,33.416 66.925,31.984 72.924,31.984 73.831,32.891 85.188,32.891 86.08,31.999 94.515,31.999 95.145,32.629 100.683,32.629 104.148,36.093 104.148,46.348 105.323,47.523 123.405,47.523 124.512,46.416 124.512,44.668 127.079,42.1 v1(128.5,42.1)
  L6 w0.152: Q1K.5@44.363,32.018 v1(44.363,32.918)
CTRL11B: Q1K.2 R25B.2 | length 145.7
  L1 w0.152: v1(148,41.9) 148.8,41.9 R25B.2@148.95,42.05
  L5 w0.152: v1(47.01,31.518) 63.466,31.518 63.864,31.12 73.809,31.12 74.597,31.908 84.781,31.908 86.207,30.482 95.148,30.482 96.056,31.391 99.546,31.391 102.106,28.831 102.106,23 105.327,19.779 105.327,14.711 105.825,14.212 123.164,14.212 123.759,14.808 123.759,32.546 124.301,33.088 124.301,36.097 128.004,39.8 128.649,39.8 130.052,41.202 147.302,41.202 v1(148,41.9)
  L6 w0.152: Q1K.2@44.363,29.818 44.363,29.152 44.52,28.995 45.592,28.995 47.01,30.413 v1(47.01,31.518)
CTRL12A: Q1L.5 R27A.2 | length 59.5
  L1 w0.152: v1(128.5,43.5) R27A.2@129.375,43.5
  L5 w0.152: v1(86.035,32.918) 86.524,32.429 94.295,32.429 94.887,33.021 100.521,33.021 103.756,36.256 103.756,46.556 105.049,47.849 105.835,47.849 123.63,47.849 124.973,46.506 124.973,45.07 126.543,43.5 v1(128.5,43.5)
  L6 w0.152: Q1L.5@86.035,32.018 v1(86.035,32.918)
CTRL12B: Q1L.2 R27B.2 | length 82.2
  L1 w0.152: v1(148,43.5) 148.9,43.5 R27B.2@148.95,43.55
  L5 w0.152: v1(88.682,31.518) 94.704,31.518 95.397,32.211 100.857,32.211 104.566,35.92 104.566,46.181 105.571,47.186 105.949,47.186 123.245,47.186 124.037,46.394 124.037,44.384 126.91,41.511 128.811,41.511 130.085,42.785 147.285,42.785 v1(148,43.5)
  L6 w0.152: Q1L.2@86.035,29.818 86.035,29.152 86.192,28.995 87.264,28.995 88.682,30.413 v1(88.682,31.518)
CTRL13A: Q1M.5 R29A.2 | length 116.3
  L1 w0.152: v1(128.4,45) R29A.2@129.375,45
  L5 w0.152: v1(23.527,44.11) 24.461,43.176 43.5,43.176 45.503,41.173 63.559,41.173 64.237,41.851 74.075,41.851 74.9,42.676 84.605,42.676 86.171,41.11 100.31,41.11 102.303,43.103 102.303,47.003 104.144,48.844 105.971,48.844 124.556,48.844 v1(128.4,45)
  L6 w0.152: Q1M.5@23.527,43.21 v1(23.527,44.11)
CTRL13B: Q1M.2 R29B.2 | length 137.2
  L1 w0.152: v1(148,45.1) 148.9,45.1 R29B.2@148.95,45.05
  L5 w0.152: v1(26.174,42.71) 43.266,42.71 45.202,40.774 84.502,40.774 85.127,40.149 100.708,40.149 103.263,42.705 103.263,46.663 104.781,48.181 123.915,48.181 125.552,46.545 125.552,45.748 127.302,43.998 129.198,43.998 129.4,44.2 147.1,44.2 v1(148,45.1)
  L6 w0.152: Q1M.2@23.527,41.01 23.527,40.344 23.684,40.187 24.756,40.187 26.174,41.605 v1(26.174,42.71)
CTRL14A: Q1N.5 R31A.2 | length 72.6
  L1 w0.152: v1(128.6,46.5) R31A.2@129.375,46.5
  L5 w0.152: v1(65.199,44.11) 66.573,42.736 73.373,42.736 74.254,43.617 84.995,43.617 86.438,42.173 94.827,42.173 95.652,42.999 100.016,42.999 101.414,44.397 101.414,47.318 103.598,49.501 125.14,49.501 128.141,46.5 v1(128.6,46.5)
  L6 w0.152: Q1N.5@65.199,43.21 v1(65.199,44.11)
CTRL14B: Q1N.2 R31B.2 | length 93.4
  L1 w0.152: v1(148,46.5) 148.9,46.5 R31B.2@148.95,46.55
  L5 w0.152: v1(67.608,41.368) 74.7,41.368 74.894,41.173 84.667,41.173 85.223,40.617 99.785,40.617 100.514,40.617 102.796,42.898 102.796,46.896 104.424,48.524 105.965,48.524 124.2,48.524 128.206,44.518 128.818,44.518 130.2,45.9 147.4,45.9 v1(148,46.5)
  L6 w0.152: Q1N.2@65.199,41.01 65.199,40.344 65.356,40.187 66.428,40.187 v1(67.608,41.368)
CTRL15A: Q1O.5 R33A.2 | length 93.7
  L1 w0.152: v1(128.6,48) R33A.2@129.375,48
  L5 w0.152: v1(44.363,44.11) 45.291,43.182 63.306,43.182 64.732,44.608 65.493,44.608 66.925,43.176 72.924,43.176 73.831,44.083 85.188,44.083 86.08,43.191 94.515,43.191 95.145,43.821 99.675,43.821 100.592,44.738 100.592,47.658 103.081,50.147 106.058,50.147 125.705,50.147 126.951,48.9 127.7,48.9 v1(128.6,48)
  L6 w0.152: Q1O.5@44.363,43.21 v1(44.363,44.11)
CTRL15B: Q1O.2 R33B.2 | length 115.1
  L1 w0.152: v1(148,48) 148.9,48 R33B.2@148.95,48.05
  L5 w0.152: v1(47.01,42.71) 63.466,42.71 63.864,42.312 73.809,42.312 74.597,43.1 84.781,43.1 86.207,41.674 95.148,41.674 96.056,42.583 100.188,42.583 101.83,44.225 101.83,47.145 103.866,49.181 105.965,49.181 124.829,49.181 128.024,45.986 128.886,45.986 130.1,47.2 144.8,47.2 145.2,47.6 147.6,47.6 v1(148,48)
  L6 w0.152: Q1O.2@44.363,41.01 44.363,40.344 44.52,40.187 45.592,40.187 47.01,41.605 v1(47.01,42.71)
CTRL16A: Q1P.5 R35A.2 | length 49.4
  L1 w0.152: v1(128.4,49.5) 129.325,49.5 R35A.2@129.375,49.55
  L5 w0.152: v1(86.035,44.11) 86.524,43.621 94.295,43.621 94.887,44.213 99.513,44.213 100.2,44.9 100.2,47.821 102.846,50.467 106.082,50.467 125.986,50.467 126.952,49.5 v1(128.4,49.5)
  L6 w0.152: Q1P.5@86.035,43.21 v1(86.035,44.11)
CTRL16B: Q1P.2 R35B.2 | length 71.8
  L1 w0.152: v1(147.9,49.6) R35B.2@148.95,49.6
  L5 w0.152: v1(88.682,42.71) 94.704,42.71 95.397,43.403 99.849,43.403 101.01,44.564 101.01,47.485 103.341,49.815 106.064,49.815 125.497,49.815 127.834,47.478 128.878,47.478 130.4,49 147.3,49 v1(147.9,49.6)
  L6 w0.152: Q1P.2@86.035,41.01 86.035,40.344 86.192,40.187 87.264,40.187 88.682,41.605 v1(88.682,42.71)
CTRL17A: Q1Q.5 R37A.2 | length 109.8
  L1 w0.152: v1(128.5,51) 129.325,51 R37A.2@129.375,51.05
  L5 w0.152: v1(23.527,55.302) 24.461,54.368 43.5,54.368 45.503,52.365 63.559,52.365 64.237,53.043 74.075,53.043 74.9,53.868 84.605,53.868 86.171,52.302 101.363,52.302 102.213,51.453 106,51.453 126.839,51.453 127.291,51 v1(128.5,51)
  L6 w0.152: Q1Q.5@23.527,54.402 v1(23.527,55.302)
CTRL17B: Q1Q.2 R37B.2 | length 129.8
  L1 w0.152: v1(148.1,51.1) R37B.2@148.95,51.1
  L5 w0.152: v1(26.174,53.902) 43.266,53.902 45.202,51.966 84.502,51.966 85.127,51.341 100.965,51.341 101.508,50.798 126.302,50.798 127.001,50.1 147.1,50.1 v1(148.1,51.1)
  L6 w0.152: Q1Q.2@23.527,52.202 23.527,51.536 23.684,51.379 24.756,51.379 26.174,52.797 v1(26.174,53.902)
CTRL18A: Q1R.5 R39A.2 | length 68
  L1 w0.152: v1(128.5,52.5) 129.325,52.5 R39A.2@129.375,52.55
  L5 w0.152: v1(65.199,55.302) 66.573,53.928 73.373,53.928 74.254,54.809 84.995,54.809 86.438,53.365 94.827,53.365 95.652,54.191 100.809,54.191 102.895,52.105 125.515,52.105 125.91,52.5 v1(128.5,52.5)
  L6 w0.152: Q1R.5@65.199,54.402 v1(65.199,55.302)
CTRL18B: Q1R.2 R39B.2 | length 87
  L1 w0.152: v1(147.9,52.7) 148.85,52.7 R39B.2@148.95,52.6
  L5 w0.152: v1(67.608,52.56) 74.7,52.56 74.894,52.365 84.667,52.365 85.223,51.809 99.785,51.809 101.159,51.809 101.85,51.118 106,51.118 126.639,51.118 127.257,50.5 128.9,50.5 130,51.6 143.9,51.6 144.228,51.272 146.472,51.272 v1(147.9,52.7)
  L6 w0.152: Q1R.2@65.199,52.202 65.199,51.536 65.356,51.379 66.428,51.379 v1(67.608,52.56)
CTRL19A: Q1S.5 R41A.2 | length 90
  L1 w0.152: v1(128.5,54) 129.325,54 R41A.2@129.375,54.05
  L5 w0.152: v1(44.363,55.302) 45.291,54.374 63.306,54.374 64.732,55.8 65.493,55.8 66.925,54.368 72.924,54.368 73.831,55.275 85.188,55.275 86.08,54.383 94.515,54.383 95.145,55.013 101.15,55.013 103.428,52.735 124.916,52.735 126.181,54 v1(128.5,54)
  L6 w0.152: Q1S.5@44.363,54.402 v1(44.363,55.302)
CTRL19B: Q1S.2 R41B.2 | length 110.3
  L1 w0.152: v1(148,54.1) R41B.2@148.95,54.1
  L5 w0.152: v1(47.01,53.902) 63.466,53.902 63.864,53.504 73.809,53.504 74.597,54.292 84.781,54.292 86.207,52.866 95.148,52.866 96.056,53.775 100.637,53.775 102.631,51.781 106.049,51.781 128.681,51.781 130.2,53.3 147.2,53.3 v1(148,54.1)
  L6 w0.152: Q1S.2@44.363,52.202 44.363,51.536 44.52,51.379 45.592,51.379 47.01,52.797 v1(47.01,53.902)
CTRL20A: Q1T.5 R43A.2 | length 46.7
  L1 w0.152: v1(128.5,55.5) 129.325,55.5 R43A.2@129.375,55.55
  L5 w0.152: v1(86.035,55.302) 86.524,54.813 94.295,54.813 94.887,55.405 101.312,55.405 103.651,53.066 106.087,53.066 124.633,53.066 127.067,55.5 v1(128.5,55.5)
  L6 w0.152: Q1T.5@86.035,54.402 v1(86.035,55.302)
CTRL20B: Q1T.2 R43B.2 | length 67.8
  L1 w0.152: v1(148,55.5) 148.067,55.5 148.167,55.6 R43B.2@148.95,55.6
  L5 w0.152: v1(88.682,53.902) 94.704,53.902 95.397,54.595 100.976,54.595 103.146,52.425 106.06,52.425 125.163,52.425 125.938,53.2 128.5,53.2 130,54.7 147.2,54.7 v1(148,55.5)
  L6 w0.152: Q1T.2@86.035,52.202 86.035,51.536 86.192,51.379 87.264,51.379 88.682,52.797 v1(88.682,53.902)
CTRL21A: Q1U.5 R45A.2 | length 118
  L1 w0.152: v1(128.5,57) 129.325,57 R45A.2@129.375,57.05
  L5 w0.152: v1(23.527,66.494) 24.461,65.56 43.5,65.56 45.503,63.557 63.559,63.557 64.237,64.235 74.075,64.235 74.9,65.06 84.605,65.06 86.171,63.494 100.272,63.494 103.296,60.47 103.296,55.378 104.652,54.021 123.763,54.021 125.265,55.524 125.265,56.47 125.795,57 v1(128.5,57)
  L6 w0.152: Q1U.5@23.527,65.594 v1(23.527,66.494)
CTRL21B: Q1U.2 R45B.2 | length 137.2
  L1 w0.152: v1(147.9,57.1) R45B.2@148.95,57.1
  L5 w0.152: v1(26.174,65.094) 43.266,65.094 45.202,63.158 84.502,63.158 85.127,62.533 99.874,62.533 102.335,60.072 102.335,54.98 103.939,53.375 124.312,53.375 127.036,56.1 146.9,56.1 v1(147.9,57.1)
  L6 w0.152: Q1U.2@23.527,63.394 23.527,62.728 23.684,62.571 24.756,62.571 26.174,63.989 v1(26.174,65.094)
CTRL22A: Q1V.5 R47A.2 | length 77.9
  L1 w0.152: v1(128.4,58.6) 129.325,58.6 R47A.2@129.375,58.55
  L5 w0.152: v1(65.199,66.494) 66.573,65.12 73.373,65.12 74.254,66.001 84.995,66.001 86.438,64.557 94.827,64.557 95.652,65.383 101.054,65.383 104.169,62.269 104.169,55.739 105.262,54.645 123.391,54.645 124.443,55.698 124.443,57.458 125.586,58.6 v1(128.4,58.6)
  L6 w0.152: Q1V.5@65.199,65.594 v1(65.199,66.494)
CTRL22B: Q1V.2 R47B.2 | length 94.9
  L1 w0.152: v1(148,58.5) 148.067,58.5 148.167,58.6 R47B.2@148.95,58.6
  L5 w0.152: v1(67.608,63.752) 74.7,63.752 74.894,63.557 84.667,63.557 85.223,63.001 99.785,63.001 100.068,63.001 102.802,60.266 102.802,55.173 104.28,53.696 124.001,53.696 126.807,56.501 128.77,56.501 129.969,57.7 138.5,57.7 139.367,56.833 146.333,56.833 v1(148,58.5)
  L6 w0.152: Q1V.2@65.199,63.394 65.199,62.728 65.356,62.571 66.428,62.571 v1(67.608,63.752)
CTRL23A: Q1W.5 R49A.2 | length 100
  L1 w0.152: v1(128.5,60) 129.325,60 R49A.2@129.375,60.05
  L5 w0.152: v1(44.363,66.494) 45.291,65.566 63.306,65.566 64.732,66.992 65.493,66.992 66.925,65.56 72.924,65.56 73.831,66.467 85.188,66.467 86.08,65.575 94.515,65.575 95.145,66.205 101.395,66.205 104.991,62.609 104.991,56.08 105.779,55.291 122.978,55.291 123.579,55.892 123.579,58.003 125.575,60 v1(128.5,60)
  L6 w0.152: Q1W.5@44.363,65.594 v1(44.363,66.494)
CTRL23B: Q1W.2 R49B.2 | length 120.8
  L1 w0.152: v1(148,60.1) R49B.2@148.95,60.1
  L5 w0.152: v1(47.01,65.094) 63.466,65.094 63.864,64.696 73.809,64.696 74.597,65.484 84.781,65.484 86.207,64.058 95.148,64.058 96.056,64.967 100.882,64.967 103.752,62.096 103.752,55.567 105,54.32 106.109,54.32 123.571,54.32 124.858,55.607 124.858,57.101 125.558,57.8 128.575,57.8 130.075,59.3 138.8,59.3 139.8,58.3 146.2,58.3 v1(148,60.1)
  L6 w0.152: Q1W.2@44.363,63.394 44.363,62.728 44.52,62.571 45.592,62.571 47.01,63.989 v1(47.01,65.094)
CTRL24A: Q1X.5 R51A.2 | length 88.8
  L1 w0.152: v1(128.4,61.5) 129.325,61.5 R51A.2@129.375,61.55
  L5 w0.152: v1(86.035,66.494) 86.524,66.005 94.295,66.005 94.887,66.597 99.497,66.597 99.9,67 99.9,73.647 102.981,76.728 102.981,83.285 105.488,85.792 105.488,88.278 106.859,89.65 122.45,89.65 123.656,88.444 123.656,75.3 123.656,65.044 127.2,61.5 v1(128.4,61.5)
  L6 w0.152: Q1X.5@86.035,65.594 v1(86.035,66.494)
CTRL24B: Q1X.2 R51B.2 | length 77.8
  L1 w0.152: v1(148.1,61.6) R51B.2@148.95,61.6
  L5 w0.152: v1(88.682,65.094) 94.704,65.094 95.397,65.787 101.222,65.787 104.572,62.436 104.572,55.906 105.513,54.966 106.26,54.966 123.197,54.966 124.004,55.773 124.004,57.723 125.58,59.3 128.7,59.3 130.21,60.81 141.21,60.81 142,61.6 v1(148.1,61.6)
  L6 w0.152: Q1X.2@86.035,63.394 86.035,62.728 86.192,62.571 87.264,62.571 88.682,63.989 v1(88.682,65.094)
CTRL25A: Q1Y.5 R53A.2 | length 146.1
  L1 w0.152: v1(128.5,63.1) 129.325,63.1 R53A.2@129.375,63.05
  L5 w0.152: v1(23.527,77.686) 24.461,76.752 43.5,76.752 45.503,74.749 63.559,74.749 64.237,75.427 74.075,75.427 74.9,76.252 84.605,76.252 86.171,74.686 99.232,74.686 101.765,77.219 101.765,83.785 104.275,86.294 104.275,88.781 106.357,90.863 122.953,90.863 124.87,88.946 124.87,66.193 127.963,63.1 v1(128.5,63.1)
  L6 w0.152: Q1Y.5@23.527,76.786 v1(23.527,77.686)
CTRL25B: Q1Y.2 R53B.2 | length 166.6
  L1 w0.152: v1(148,63) 148.067,63 148.167,63.1 R53B.2@148.95,63.1
  L5 w0.152: v1(26.174,76.286) 43.266,76.286 45.202,74.35 84.502,74.35 85.127,73.725 99.42,73.725 102.578,76.882 102.578,83.467 105.074,85.963 105.074,88.45 106.688,90.064 122.621,90.064 124.07,88.615 124.07,65.402 127.407,62.065 129.165,62.065 129.4,62.3 147.3,62.3 v1(148,63)
  L6 w0.152: Q1Y.2@23.527,74.586 23.527,73.92 23.684,73.763 24.756,73.763 26.174,75.181 v1(26.174,76.286)
CTRL26A: Q1Z.5 R55A.2 | length 102.6
  L1 w0.152: v1(128.6,64.6) 129.325,64.6 R55A.2@129.375,64.55
  L5 w0.152: v1(65.199,77.686) 66.573,76.312 73.373,76.312 74.254,77.193 84.995,77.193 86.438,75.749 94.827,75.749 95.652,76.575 99.689,76.575 100.912,77.798 100.912,84.023 103.541,86.651 103.541,89.193 106.023,91.675 123.289,91.675 125.682,89.283 125.682,67.021 128.103,64.6 v1(128.6,64.6)
  L6 w0.152: Q1Z.5@65.199,76.786 v1(65.199,77.686)
CTRL26B: Q1Z.2 R55B.2 | length 123.5
  L1 w0.152: v1(147.9,64.7) 147.967,64.7 148.067,64.6 R55B.2@148.95,64.6
  L5 w0.152: v1(67.608,74.944) 74.7,74.944 74.894,74.749 84.667,74.749 85.223,74.193 99.332,74.193 102.185,77.045 102.185,83.649 104.667,86.132 104.667,88.618 106.519,90.47 122.79,90.47 124.477,88.783 124.477,65.823 125.248,65.052 127.756,62.544 128.897,62.544 129.953,63.6 138.2,63.6 138.5,63.3 146.5,63.3 v1(147.9,64.7)
  L6 w0.152: Q1Z.2@65.199,74.586 65.199,73.92 65.356,73.763 66.428,73.763 v1(67.608,74.944)
CTRL27A: Q1AA.5 R58A.2 | length 123.5
  L1 w0.152: v1(128.5,66) 129.325,66 R58A.2@129.375,66.05
  L5 w0.152: v1(44.363,77.686) 45.291,76.758 63.306,76.758 64.732,78.184 65.493,78.184 66.925,76.752 72.924,76.752 73.831,77.659 85.188,77.659 86.08,76.767 94.515,76.767 95.145,77.397 99.413,77.397 100.136,78.12 100.136,84.344 102.855,87.063 102.855,89.604 105.702,92.452 123.611,92.452 126.458,89.604 126.458,68.042 v1(128.5,66)
  L6 w0.152: Q1AA.5@44.363,76.786 v1(44.363,77.686)
CTRL27B: Q1AA.2 R58B.2 | length 145.2
  L1 w0.152: v1(148,66.1) R58B.2@148.95,66.1
  L5 w0.152: v1(47.01,76.286) 63.466,76.286 63.864,75.888 73.809,75.888 74.597,76.676 84.781,76.676 86.207,75.25 95.148,75.25 96.056,76.159 99.82,76.159 101.3,77.638 101.3,83.863 103.902,86.465 103.902,89.006 106.184,91.288 123.129,91.288 125.295,89.122 125.295,66.664 126.411,65.548 127.959,64 129.1,64 130.208,65.108 147.008,65.108 v1(148,66.1)
  L6 w0.152: Q1AA.2@44.363,74.586 44.363,73.92 44.52,73.763 45.592,73.763 47.01,75.181 v1(47.01,76.286)
CTRL28A: Q1AB.5 R60A.2 | length 78.6
  L1 w0.152: v1(128.5,67.5) 129.325,67.5 R60A.2@129.375,67.55
  L5 w0.152: v1(86.035,77.686) 86.524,77.197 94.295,77.197 94.887,77.789 99.282,77.789 99.766,78.273 99.766,84.498 102.516,87.248 102.516,89.79 105.549,92.822 123.764,92.822 126.829,89.757 126.829,69.171 127.8,68.2 v1(128.5,67.5)
  L6 w0.152: Q1AB.5@86.035,76.786 v1(86.035,77.686)
CTRL28B: Q1AB.2 R60B.2 | length 101.8
  L1 w0.152: v1(148,67.6) R60B.2@148.95,67.6
  L5 w0.152: v1(88.682,76.286) 94.704,76.286 95.397,76.979 99.545,76.979 100.525,77.959 100.525,84.183 103.201,86.859 103.201,89.4 105.863,92.063 123.45,92.063 126.069,89.443 126.069,67.528 126.818,66.779 128.197,65.4 128.7,65.4 130,66.7 147.1,66.7 v1(148,67.6)
  L6 w0.152: Q1AB.2@86.035,74.586 86.035,73.92 86.192,73.763 87.264,73.763 88.682,75.181 v1(88.682,76.286)
CTRL29A: Q1AC.5 R62A.2 | length 137.1
  L1 w0.152: R62A.2@129.375,69.05 129.375,69.1 129.749,69.474 129.799,69.474 v1@130.157,69.832
  L5 w0.152: v1(23.527,88.878) 24.461,87.944 43.5,87.944 45.503,85.941 63.559,85.941 64.237,86.619 74.075,86.619 74.9,87.444 84.605,87.444 86.171,85.878 99.261,85.878 101.513,88.13 101.513,90.527 105.014,94.028 124.263,94.028 128.034,90.257 128.034,71.193 129.396,69.832 v1(130.167,69.832)
  L6 w0.152: Q1AC.5@23.527,87.978 v1(23.527,88.878)
CTRL29B: Q1AC.2 R62B.2 | length 156.8
  L1 w0.15: v1(148,69) 148.85,69 R62B.2@148.95,69.1
  L5 w0.15: 128.903,68.17 132.97,68.17 133.1,68.3 138.8,68.3 139.3,67.8 146.1,67.8 147.3,69 v1(148,69)
  L5 w0.152: v1(26.174,87.478) 43.266,87.478 45.202,85.542 84.502,85.542 85.127,84.917 99.659,84.917 102.192,87.45 102.192,90.044 105.354,93.206 123.923,93.206 127.213,89.917 127.213,69.861 128.903,68.17
  L6 w0.152: Q1AC.2@23.527,85.778 23.527,85.112 23.684,84.955 24.756,84.955 26.174,86.373 v1(26.174,87.478)
CTRL30A: Q1AD.5 R64A.2 | length 93.4
  L1 w0.152: R64A.2@129.375,70.55 129.375,70.6 129.749,70.974 129.799,70.974 v1@130.157,71.332
  L5 w0.152: v1(65.199,88.878) 66.573,87.504 73.373,87.504 74.254,88.385 84.995,88.385 86.438,86.941 94.827,86.941 95.652,87.767 99.87,87.767 100.863,88.76 100.863,91.043 104.672,94.852 124.605,94.852 128.858,90.598 128.858,72.64 v1(130.167,71.332)
  L6 w0.152: Q1AD.5@65.199,87.978 v1(65.199,88.878)
CTRL30B: Q1AD.2 R64B.2 | length 112.4
  L1 w0.152: v1(148.1,70.6) R64B.2@148.95,70.6
  L5 w0.152: v1(67.608,86.136) 74.7,86.136 74.894,85.941 84.667,85.941 85.223,85.385 99.465,85.385 101.854,87.773 101.854,90.278 105.186,93.611 124.091,93.611 127.617,90.084 127.617,70.598 129.152,69.063 132.263,69.063 133.2,70 146.3,70 146.9,70.6 v1(148.1,70.6)
  L6 w0.152: Q1AD.2@65.199,85.778 65.199,85.112 65.356,84.955 66.428,84.955 v1(67.608,86.136)
CTRL31A: Q1AE.5 R66A.2 | length 114.4
  L1 w0.152: R66A.2@129.375,72.05 129.375,72.1 129.749,72.474 129.799,72.474 v1@130.157,72.832
  L5 w0.152: v1(44.363,88.878) 45.291,87.95 63.306,87.95 64.732,89.376 65.493,89.376 66.925,87.944 72.924,87.944 73.831,88.851 85.188,88.851 86.08,87.959 94.515,87.959 95.145,88.589 99.529,88.589 100.185,89.245 100.185,91.507 104.338,95.66 124.94,95.66 129.718,90.881 129.718,73.28 v1(130.167,72.832)
  L6 w0.152: Q1AE.5@44.363,87.978 v1(44.363,88.878)
CTRL31B: Q1AE.2 R66B.2 | length 134.2
  L1 w0.152: v1(148.1,72.1) R66B.2@148.95,72.1
  L5 w0.152: v1(47.01,87.478) 63.466,87.478 63.864,87.08 73.809,87.08 74.597,87.868 84.781,87.868 86.207,86.442 95.148,86.442 96.056,87.351 100.042,87.351 101.191,88.5 101.191,90.782 104.845,94.436 124.433,94.436 128.442,90.426 128.442,71.758 129.65,70.55 131.85,70.55 132.7,71.4 147.4,71.4 v1(148.1,72.1)
  L6 w0.152: Q1AE.2@44.363,85.778 44.363,85.112 44.52,84.955 45.592,84.955 47.01,86.373 v1(47.01,87.478)
CTRL32A: Q1AF.5 R68A.2 | length 69.8
  L1 w0.152: R68A.2@129.3,73.625 R68A.2@129.375,73.55 129.375,73.6 130.18,74.405 v1(130.2,74.405)
  L5 w0.152: v1(86.035,88.878) 86.524,88.389 94.295,88.389 94.887,88.981 99.323,88.981 99.805,89.462 99.805,91.717 104.165,96.077 125.112,96.077 130.2,90.99 v1(130.2,74.405)
  L6 w0.152: Q1AF.5@86.035,87.978 Q1AF.5@86.035,88.039 v1(86.035,88.878)